# Altium PCB MD040_RevA.PcbDoc (part 4 of 6)
Units mil, origin at the board's own origin, x right, y up, seen from the top; angles counter-clockwise.
Board outline 5000 x 5000 mil, 4 copper layers (Top Layer, Signal Layer 1, Signal Layer 2, Bottom Layer), stack 61.2 mil thick; 336 components, 205 nets, 921 pads, 354 vias.
Unrouted connection lines stored in the file: 124.
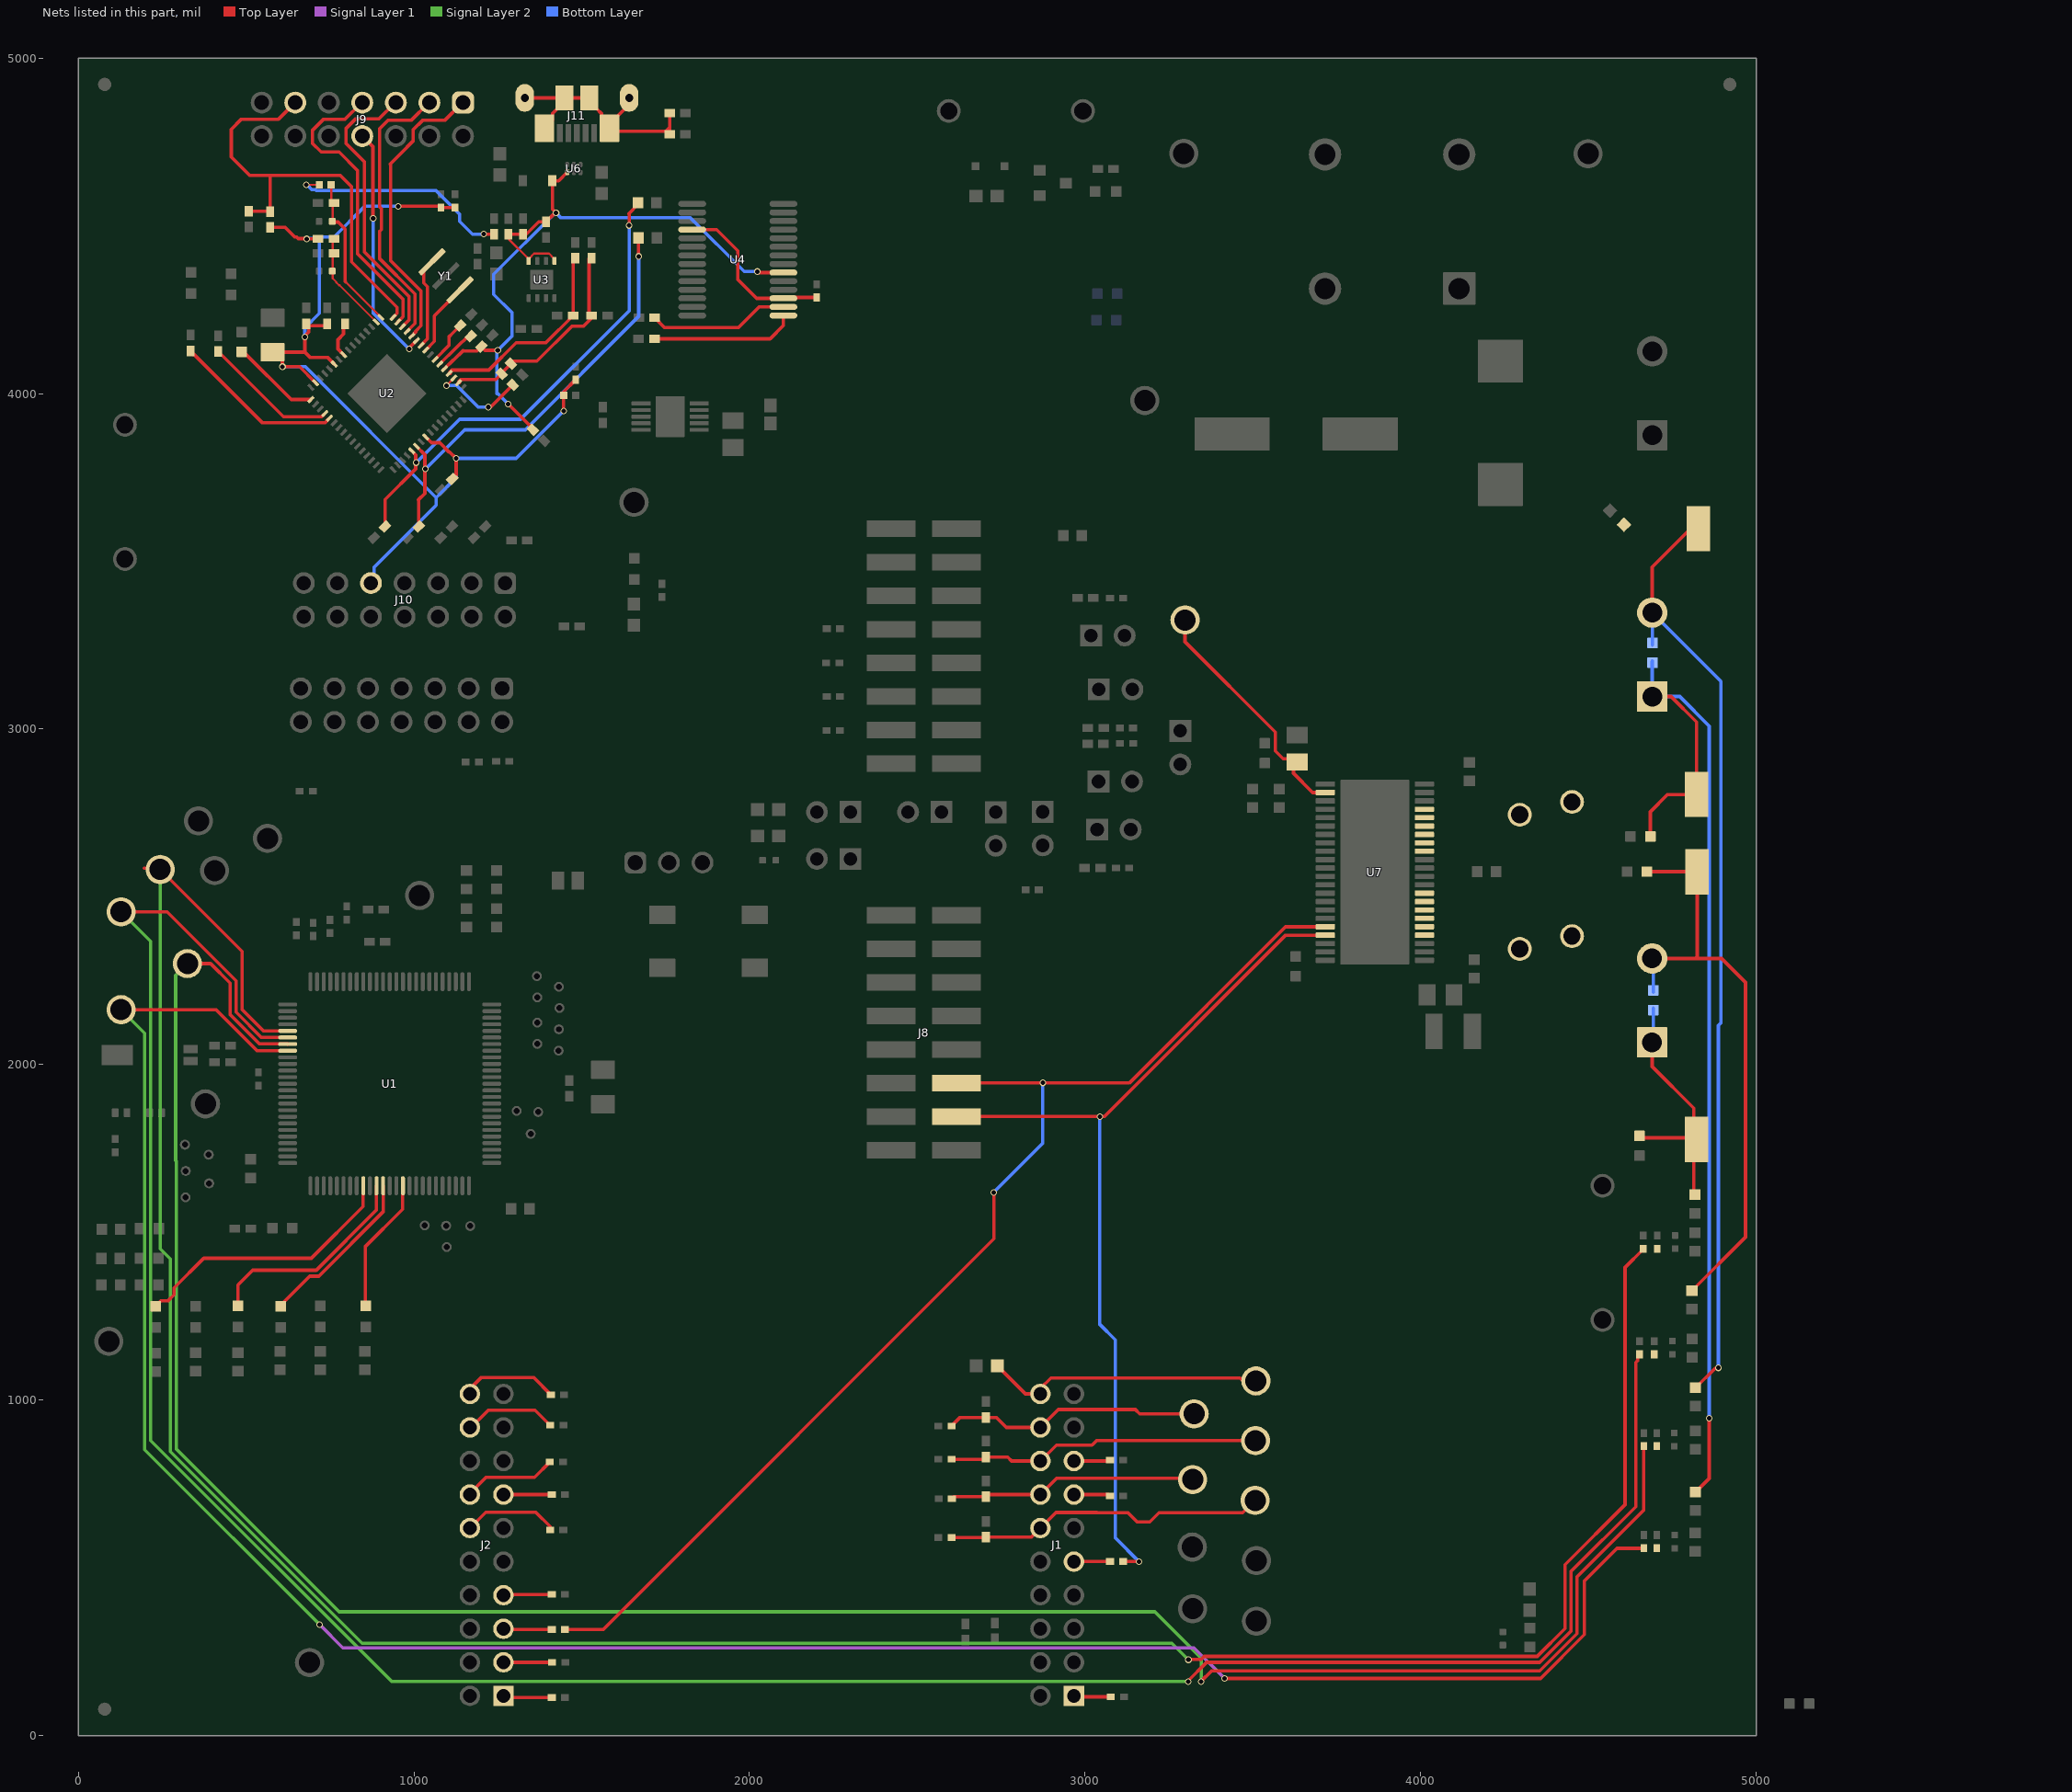
[diagram p5: the nets of this part, all layers, seen from the top]

## Part data (continued)
R77: library part CMP-0026859-2, "RES, 1.0 M, 5%, 0.063 W, AEC-Q200 Grade 0, 0402", Manufacturer=Vishay-Dale, Power_W=63mW, Supplier Part Number 1=541-1.0MJCT-ND, TempCo="200 ppm/C", Tolerance_%=5%, Value2=0.063W, Value_Code=1M00, ValueDisplayed=1.0M, AEC Category=Q200, AEC Grade=0, AEC Qualified=Y, ComponentLink1Description="Datasheet link", ComponentLink1URL=http://www.vishay.com/docs/20035/dcrcwe3.pdf, CompType=Resistor, EIA_Code=E24, MountType=SMT, PackageReference=0402, PartNumber=CRCW04021M00JNED, Res_ohm=1M, RoHS=E, SizeArea_mm2=0.5, SizeX_mm=1, SizeY_mm=0.5, SizeZ_mm=0.6, Supplier 1=Digi-Key, Supplier 2=Newark, Supplier 3=Mouser, Supplier Part Number 2=59M6694, Supplier Part Number 3=71-CRCW0402J-1M-E3, Technology="Thick Film", Value1=5%, VDC_V=50V
R78: library part CMP-0026907-3, "RES, 33 k, 5%, 0.063 W, AEC-Q200 Grade 0, 0402", Manufacturer=Vishay-Dale, Power_W=63mW, Supplier Part Number 1=541-33KJCT-ND, TempCo="200 ppm/C", Tolerance_%=5%, Value2=0.063W, Value_Code=33k0, ValueDisplayed=33k, AEC Category=Q200, AEC Grade=0, AEC Qualified=Y, ComponentLink1Description="Datasheet link", ComponentLink1URL=http://www.vishay.com/docs/20035/dcrcwe3.pdf, CompType=Resistor, EIA_Code=E24, MountType=SMT, PackageReference=0402, PartNumber=CRCW040233K0JNED, Res_ohm=33k, RoHS=E, SizeArea_mm2=0.5, SizeX_mm=1, SizeY_mm=0.5, SizeZ_mm=0.6, Supplier 1=Digi-Key, Supplier 2=Newark, Supplier 3=Mouser, Supplier Part Number 2=59M6727, Supplier Part Number 3=71-CRCW0402J-33K-E3, Technology="Thick Film", Value1=5%, VDC_V=50V
R79 R80 R81 R82: library part CMP-0026695-1, "RES, 3.30 k, 1%, 0.1 W, AEC-Q200 Grade 0, 0402", Manufacturer=Panasonic, Power_W=100mW, Supplier Part Number 1=P3.30KLCT-ND, TempCo="100 ppm/C", Tolerance_%=1%, Value2=0.1W, Value_Code=3k30, ValueDisplayed=3.30k, AEC Category=Q200, AEC Grade=0, AEC Qualified=Y, ComponentLink1Description="Datasheet link", ComponentLink1URL=http://industrial.panasonic.com/cdbs/www-data/pdf/RDA0000/AOA0000C86.pdf, CompType=Resistor, LatestRevisionDate=2017-03-09, MountType=SMT, PackageReference=0402, PartNumber=ERJ-2RKF3301X, Published=2008-06-26, Publisher="Texas Instruments", Res_ohm=3.3k, RoHS=Y, SizeArea_mm2=0.5, SizeX_mm=1, SizeY_mm=0.5, SizeZ_mm=0.6, Supplier 1=Digi-Key, Supplier 2=Newark, Supplier 3=Mouser, Supplier Part Number 2=64R5278, Supplier Part Number 3=667-ERJ-2RKF3301X, Technology="Thick Film", U/M=EA, Value1=1%, VDC_V=50V
R83 R88: library part CMP-0025886-3, "RES, 10 k, 5%, 0.1 W, 0603", Manufacturer="Yageo America", Power_W=100mW, Supplier Part Number 1=311-10KGRCT-ND, TempCo="100 ppm/C", Tolerance_%=5%, Value2=0.1W, Value_Code=10k0, ValueDisplayed=10k, AEC Category=Q200, AEC Qualified=?, ComponentLink1Description="Datasheet link", ComponentLink1URL=http://www.yageo.com/pdf/Pu-RC0603_51_PbFree_L_2.pdf, CompType=Resistor, EIA_Code=E24, LatestRevisionDate=2017-03-09, MountType=SMT, PackageReference=0603, PartNumber=RC0603JR-0710KL, Published=2008-06-26, Publisher="Texas Instruments", Res_ohm=10k, RoHS=Y, SizeArea_mm2=1.28, SizeX_mm=1.6, SizeY_mm=0.8, SizeZ_mm=1, Supplier 1=Digi-Key, Supplier 2=Mouser, Supplier 3=Farnell, Supplier Part Number 2=603-RC0603JR-0710KL, Supplier Part Number 3=9233504, Technology="Thick Film", U/M=EA, Value1=5%, VDC_V=50V
R84 R85 R86 R87: library part CMP-0081856-1, "RES, 0, 0%, 0.2 W, AEC-Q200 Grade 0, 0402", Manufacturer=Vishay-Dale, Power_W=200mW, Supplier Part Number 1=541-0.0YBTR-ND, Tolerance_%=0%, Value2=0.2W, Value_Code=0, AEC Category=Q200, AEC Grade=0, AEC Qualified=Y, ComponentLink1Description="Datasheet link", ComponentLink1URL=http://www.vishay.com/docs/20043/crcwhpe3.pdf, CompType=Resistor, MountType=SMT, PackageReference=0402, PartNumber=CRCW04020000Z0EDHP, Res_ohm=0, RoHS=Y, SizeArea_mm2=0.5, SizeAreaWB_mm2=3, SizeX_mm=1, SizeY_mm=0.5, SizeZ_mm=0.6, Supplier 1=Digi-Key, Supplier 2=Newark, Supplier 3=Mouser, Supplier Part Number 2=96Y9050, Supplier Part Number 3=71-CRCW04020000Z0EDH, Technology="Thick Film", Value1=0%, ValueDisplayed=0, VDC_V=50V
R89 R90 R91 R92: library part CMP-0022628-3, "RES, 86.6 k, 1%, 0.1 W, 0603", Manufacturer=Vishay-Dale, Power_W=100mW, Supplier Part Number 1=541-86.6KHCT-ND, TempCo="100 ppm/C", Tolerance_%=1%, Value2=0.1W, Value_Code=86k6, ValueDisplayed=86.6k, AEC Category=Q200, AEC Qualified=?, ComponentLink1Description="Datasheet link", ComponentLink1URL=http://www.vishay.com/docs/20035/dcrcwe3.pdf, CompType=Resistor, EIA_Code=E96, LatestRevisionDate=2017-03-09, MountType=SMT, PackageReference=0603, PartNumber=CRCW060386K6FKEA, Published=2008-06-26, Publisher="Texas Instruments", Res_ohm=86.6k, RoHS=Y, SizeArea_mm2=1.28, SizeX_mm=1.6, SizeY_mm=0.8, SizeZ_mm=1, Supplier 1=Digi-Key, Supplier 2=Newark, Supplier 3=Mouser, Supplier Part Number 2=52K8751, Supplier Part Number 3=71-CRCW0603-86.6K-E3, Technology="Thick Film", U/M=EA, Value1=1%, VDC_V=75V
R93 R94 R95 R96 R104: library part CMP-0022458-4, "RES, 4.99 k, 1%, 0.1 W, AEC-Q200 Grade 0, 0603", Manufacturer=Vishay-Dale, Power_W=100mW, Supplier Part Number 1=541-4.99KHCT-ND, TempCo="100 ppm/C", Tolerance_%=1%, Value2=0.1W, Value_Code=4k99, ValueDisplayed=4.99k, AEC Category=Q200, AEC Grade=0, AEC Qualified=Y, ComponentLink1Description="Datasheet link", ComponentLink1URL=http://www.vishay.com/docs/20035/dcrcwe3.pdf, CompType=Resistor, EIA_Code=E96, MountType=SMT, PackageReference=0603, PartNumber=CRCW06034K99FKEA, Res_ohm=4.99k, RoHS=E, SizeArea_mm2=1.28, SizeX_mm=1.6, SizeY_mm=0.8, SizeZ_mm=1, Supplier 1=Digi-Key, Supplier 2=Newark, Supplier 3=Mouser, Supplier Part Number 2=52K8500, Supplier Part Number 3=71-CRCW0603-4.99K-E3, Technology="Thick Film", Value1=1%, VDC_V=75V
R98: library part CMP-0025663-3, "RES, 97.6 k, 0.5%, 0.1 W, 0603", Manufacturer="Yageo America", Power_W=100mW, TempCo="50 ppm/C", Tolerance_%=0.5%, Value2=0.1W, Value_Code=97k6, ValueDisplayed=97.6k, AEC Category=Q200, AEC Qualified=?, ComponentLink1Description="Datasheet link", ComponentLink1URL=http://www.yageo.com/pdf/PYu-RT_1-to-0.05_RoHS_L_3.pdf, CompType=Resistor, EIA_Code=E192, LatestRevisionDate=2017-03-09, MountType=SMT, PackageReference=0603, PartNumber=RT0603DRE0797K6L, Published=2008-06-26, Publisher="Texas Instruments", Res_ohm=97.6k, RoHS=Y, SizeArea_mm2=1.28, SizeX_mm=1.6, SizeY_mm=0.8, SizeZ_mm=1, Technology="Thin Film", U/M=EA, Value1=0.5%, VDC_V=75V
R99 R100 R101 R102 R103 R105 R106 R107 R108 R109: library part CMP-0025886-5, "RES, 10 k, 5%, 0.1 W, 0603", Manufacturer=Yageo, Power_W=100mW, Supplier Part Number 1=311-10KGRCT-ND, TempCo="100 ppm/C", Tolerance_%=5%, Value2=0.1W, Value_Code=10k0, ValueDisplayed=10k, AEC Category=Q200, AEC Grade=N/A, AEC Qualified=N, ComponentLink1Description="Datasheet link", ComponentLink1URL=http://www.yageo.com/pdf/Pu-RC0603_51_PbFree_L_2.pdf, CompType=Resistor, EIA_Code=E24, MountType=SMT, PackageReference=0603, PartNumber=RC0603JR-0710KL, Res_ohm=10k, RoHS=Y, SizeArea_mm2=1.28, SizeAreaWB_mm2=4.68, SizeX_mm=1.6, SizeY_mm=0.8, SizeZ_mm=1, Supplier 1=Digi-Key, Supplier 2=Mouser, Supplier 3=Farnell, Supplier Part Number 2=603-RC0603JR-0710KL, Supplier Part Number 3=9233504, Technology="Thick Film", Value1=5%, VDC_V=75V
R110: library part CMP-0023183-5, "RES, 560, 1%, 0.1 W, 0603", Manufacturer=Yageo, Power_W=100mW, Supplier Part Number 1=311-560HRCT-ND, TempCo="100 ppm/C", Tolerance_%=1%, Value2=0.1W, Value_Code=560R, ValueDisplayed=560, AEC Category=Q200, AEC Grade=N/A, AEC Qualified=N, ComponentLink1Description="Datasheet link", ComponentLink1URL=http://www.yageo.com/pdf/Pu-RC0603_51_PbFree_L_2.pdf, CompType=Resistor, MountType=SMT, PackageReference=0603, PartNumber=RC0603FR-07560RL, Res_ohm=560, RoHS=Y, SizeArea_mm2=1.28, SizeAreaWB_mm2=4.68, SizeX_mm=1.6, SizeY_mm=0.8, SizeZ_mm=1, Supplier 1=Digi-Key, Supplier 2=Mouser, Supplier 3=Farnell, Supplier Part Number 2=603-RC0603FR-07560RL, Supplier Part Number 3=9238450, Technology="Thick Film", Value1=1%, VDC_V=75V
R111 R112 R113 R114 R115 R116 R117: "RES, 330, 5%, 0.1 W, AEC-Q200 Grade 0, 0603", Manufacturer=Vishay-Dale, PartNumber=CRCW0603330RJNEA, Power_W=100mW, Supplier Part Number 1=541-330GCT-ND, TempCo="200 ppm/C", Tolerance_%=5%, Value2=0.1W, Value_Code=330R, ValueDisplayed=330, AEC Category=Q200, AEC Grade=0, AEC Qualified=Y, ComponentLink1Description="Datasheet link", ComponentLink1URL=http://www.vishay.com/docs/20035/dcrcwe3.pdf, CompType=Resistor, EIA_Code=E24, MountType=SMT, PackageReference=0603, Res_ohm=330, RoHS=E, SizeArea_mm2=1.28, SizeX_mm=1.6, SizeY_mm=0.8, SizeZ_mm=1, Supplier 1=Digi-Key, Supplier 2=Newark, Supplier 3=Mouser, Supplier Part Number 2=59M6805, Supplier Part Number 3=71-CRCW0603J-330-E3, Technology="Thick Film", Value1=5%, VDC_V=75V
R118: library part CMP-0023129-5, "RES, 470, 1%, 0.1 W, 0603", Manufacturer=Yageo, Power_W=100mW, Supplier Part Number 1=311-470HRCT-ND, TempCo="100 ppm/C", Tolerance_%=1%, Value2=0.1W, Value_Code=470R, ValueDisplayed=470, AEC Category=Q200, AEC Grade=N/A, AEC Qualified=N, ComponentLink1Description="Datasheet link", ComponentLink1URL=http://www.yageo.com/pdf/Pu-RC0603_51_PbFree_L_2.pdf, CompType=Resistor, MountType=SMT, PackageReference=0603, PartNumber=RC0603FR-07470RL, Res_ohm=470, RoHS=Y, SizeArea_mm2=1.28, SizeAreaWB_mm2=4.68, SizeX_mm=1.6, SizeY_mm=0.8, SizeZ_mm=1, Supplier 1=Digi-Key, Supplier 2=Mouser, Supplier 3=Farnell, Supplier Part Number 2=603-RC0603FR-07470RL, Supplier Part Number 3=9238441, Technology="Thick Film", Value1=1%, VDC_V=75V
S1: library part CMP-0097347-1, "Tactile Switch SPST-NO Top Actuated Surface Mount", Coil Resistance_ohm=100mΩ, Contact Current Rating=50mA, Digikey Part Number=732-7022-1-ND, Manufacturer="Wurth Electronics", Mouser Part Number=710-430481025816, Operating Force=160gf, Operating Temperature Range="-40°C to +85°C", AEC Qualified=No, Circuit=SPST-NO, ComponentLink1Description=Datasheet, ComponentLink1URL=https://www.we-online.com/catalog/datasheet/430481025816.pdf, datasheet=https://www.we-online.com/catalog/datasheet/430481025816.pdf, Datasheet Path=datasheets/Switch-430481025816.pdf, Digikey Description="SWITCH TACTILE SPST-NO 0.05A 12V", Electromechanical Life=1000000Cycles, helpURL=https://upverter.com/upn/revision/d8864f3c5ff6f52e/, Lead Free=Yes, MountType="Surface Mount", Mouser Description="Switch Tactile Spst-no 0.05A 12V", PackageReference=SMT_SW_6MM2_6MM2, Part Number=430481025816, PartNumber=430481025816, RoHS=TRUE, SizeZ_mm=2.7mm, Supplier 1=Digikey, Supplier 2=Mouser, Supplier Part Number 1=732-7022-1-ND, Supplier Part Number 2=710-430481025816, VDC_V=12V
SH-J1 SH-J2 SH-J3 SH-J4 SH-J5 SH-J6 SH-J7 SH-J8 SH-J9 SH-J10 SH-J11 SH-J12 SH-J13 SH-J14 SH-J15 SH-J16 SH-J17 SH-J18 SH-J19 SH-J20 SH-J21 SH-J22 SH-J23 SH-J24 SH-J25 SH-J26 SH-J27 SH-J28 SH-J29 SH-J30 SH-J31: library part CMP-0003761-2, "Shunt, 2.54mm, Gold, Black", Manufacturer="Wurth Elektronik", Supplier Part Number 1=732-2678-ND, ClassName=Shunt, ComponentLink1Description="Datasheet Link", ComponentLink1URL=http://katalog.we-online.de/em/datasheet/60900213421.pdf, CompType=Shunt, MountType=N/A, PackageReference="Shunt, 2.54mm, Black", PartNumber=60900213421, RoHS=Y, Supplier 1=Digi-Key, Supplier 2=Newark, Supplier 3=Mouser, Supplier Part Number 2=16T0609, Supplier Part Number 3=710-60900213421
TP1 TP2 TP3 TP4 TP5 TP6 TP7 TP8 TP9 TP10 TP11 TP12 TP18 TP19 TP20 TP21 TP22 TP23 TP24 TP26: library part CMP-0003719-1, "Testpoint", Manufacturer="Texas Instruments", ComponentLink1Description="Datasheet Link", ComponentLink1URL="https://sps06.itg.ti.com/sites/KMS/crossdivteams/altium/docs/ComponentDatasheets/testpin with 750um Padsice and 450um drillhole.pdf", CompType=Pad, Key=TP_H0.45P0.75, LatestRevisionDate=2017-03-09, MountType=TH, PackageReference="Test Point, 0.45mm hole size", PartNumber=TP_H0.45P0.75, Publisher="Texas Instruments"
TP25 TP29: library part CMP-0055148-1, "Test Point, Multipurpose, Black, TH", Color=Black, Manufacturer=Keystone, Supplier Part Number 1=36-5011-ND, CNHeader=FALSE, ComponentLink1Description="Datasheet URL", ComponentLink1URL=http://www.keyelco.com/userAssets/file/M60-2p60.pdf, CompType="Test Point", ContactFinish=Silver, CT=TRUE, Green_EU RoHS=Passed, Green_EU RoHS-2=Incomplete, Green_Lifecycle=Active, Green_REACh=Passed, LatestRevisionDate=26/05/2017, MountType=TH, PackageReference="Black Multipurpose Testpoint", PartNumber=5011, Publisher="Texas Instruments", RoHS=Y, Supplier 1=Digi-Key, Supplier 2=Mouser, Supplier Part Number 2=534-5011
TP27 TP28 TP30 TP36: library part CMP-0055147-1, "Test Point, Multipurpose, Red, TH", Color=Red, Manufacturer=Keystone, Supplier Part Number 1=36-5010-ND, CNHeader=FALSE, ComponentLink1Description="Datasheet URL", ComponentLink1URL=http://www.keyelco.com/userAssets/file/M60-2p60.pdf, CompType="Test Point", ContactFinish=Silver, CT=TRUE, Green_EU RoHS=Passed, Green_EU RoHS-2=Incomplete, Green_Lifecycle=Active, Green_REACh=Passed, LatestRevisionDate=26/05/2017, MountType=TH, PackageReference="Red Multipurpose Testpoint", PartNumber=5010, Publisher="Texas Instruments", RoHS=Y, Supplier 1=Digi-Key, Supplier 2=Mouser, Supplier Part Number 2=534-5010
TP31 TP32 TP34 TP35: library part CMP-0055152-1, "Test Point, Miniature, SMT", Manufacturer=Keystone, Supplier Part Number 1=36-5015TR-ND, CNHeader=FALSE, ComponentLink1Description="Datasheet URL", ComponentLink1URL=http://www.keyelco.com/userAssets/store/files/5015.PDF, CompType="Test Point", CT=TRUE, Green_EU RoHS=Passed, Green_EU RoHS-2=Incomplete, Green_Lifecycle=Active, Green_REACh=Passed, LatestRevisionDate=26/05/2017, MountType=SMT, PackageReference=Testpoint_Keystone_Miniature, PartNumber=5015, Publisher="Texas Instruments", RoHS=Y, Supplier 1=Digi-Key, Supplier 2=Mouser, Supplier Part Number 2=534-5015
U1: library part CMP-0038879-1, "20 MHz Mixed Signal Microcontroller with 256 KB Flash, 18432 B SRAM and 74 GPIOs, -40 to 85 degC, 100-pin QFP (PZ), Green (RoHS & no Sb/Br)", Frequency(MHz)=20, Manufacturer="Texas Instruments", Temp Sensor=Yes, ADC="12-bit SAR", ADC Channels=16, Brown Out Reset=Yes, Code_JEDEC=MS-026, Comparators=Yes, ComponentLink1Description="Manufacturer URL", ComponentLink1URL=http://www.ti.com/, ComponentLink2Description=Datasheet, ComponentLink2URL=http://www.ti.com/general/docs/lit/getliterature.tsp?genericPartNumber=MSP430F5338&fileType=pdf, ComponentLink3Description="Package Specification", ComponentLink3URL=http://www.ti.com/lit/ml/mtqf013a/mtqf013a.pdf, DAC=2, DatasheetVersion=SLAS721B, DMA=3, Eco-Plan="Green (RoHS & no Sb/Br)", Flash(KB)=256, GPIO=74, Mounting Technology="Surface Mount", Multiplier=32x32, PackageDescription="100-Pin Plastic Flat Pack, Body 14 x 14 mm, Pitch 0.5 mm", PackageReference=PZT0100A, PackageVersion=4040149/B, PartNumber=MSP430F5338IPZ, Real-Time Clock=Yes, SRAM(B)=18432, SubFamily="5 Series", SVS=Yes, Timers - 16-bit=4, USCI_A (UART/LIN/IrDA/SPI)=2, USCI_B (I2C & SPI)=2, Watchdog=Yes
U2: "16-Bit Ultra-Low-Power Microcontroller, 128KB Flash, 8KB RAM, USB, 12Bit ADC, 2 USCIs, 32Bit HW MPY, RGC0064B (VQFN-64)", Alternate Manufacturer="Texas Instruments", Alternate PartNumber=MSP430F5528IRGCR, Frequency(MHz)=25, Operating Temperature Range="-40 to 85 C", PartNumber=MSP430F5528IRGCT, Rating=Catalog, Temp Sensor=Yes, ADC="12-bit SAR", ADC Channels=16, AEC Category=Q200, AEC Qualified=N, Brown Out Reset=Yes, Comparators=Yes, ComponentLink1Description="Datasheet Link", ComponentLink1URL=http://www.ti.com/lit/ds/symlink/msp430f5528.pdf, ComponentLink2Description="Product Folder", ComponentLink2URL=http://www.ti.com/product/msp430f5528, ComponentLink3Description="Online Datasheet", ComponentLink3URL=http://www.ti.com/product/msp430f5528/datasheet, CompType=IC, DMA=3, Flash(KB)=128, GPIO=47, Green_EU RoHS=Passed, Green_EU RoHS-2=Passed, Green_Lifecycle=Active, Green_REACh=Passed, Manufacturer="Texas Instruments", MountType=SMT, Multiplier=32x32, PackageDescription=VQFN-64, PackageReference=RGC0064B, Real-Time Clock=Yes, RoHS=Y, SizeArea_mm2=81.0, SizeAreaWB_mm2=121.0, SizeX_mm=9.0, SizeY_mm=9.0, SizeZ_mm=1.0, SRAM(B)=8192, SVS=Yes, Timers - 16-bit=4, USB=1, USCI_A (UART/LIN/IrDA/SPI)=2, USCI_B (I2C & SPI)=2, Watchdog=Yes
U3: library part CMP-0036328-3, "500mA, Adjustable, Low Quiescent Current, Low-Noise, High-PSRR, Single-Output LDO Regulator, DRB0008A (VSON-8)", Manufacturer="Texas Instruments", Operating Temperature Range="-40 to 125 C", Rating=Catalog, Accuracy(%)=2, AEC Category=Q200, AEC Qualified=N, ComponentLink1Description="Datasheet Link", ComponentLink1URL=http://www.ti.com/lit/ds/symlink/tps735.pdf, ComponentLink2Description="Product Folder", ComponentLink2URL=http://www.ti.com/product/tps735, ComponentLink3Description="Online Datasheet", ComponentLink3URL=http://www.ti.com/product/tps735/datasheet, CompType=IC, Fixed Output Options(V)=3.3, Green_EU RoHS=Passed, Green_EU RoHS-2=Passed, Green_Lifecycle=Active, Green_REACh=Passed, Iout(Max)(A)=0.5, Iq(Typ)(mA)=0.04, MountType=SMT, PackageDescription=VSON-8, PackageReference=DRB0008A, PartNumber=TPS73533DRBR, RoHS=Y, SizeArea_mm2=9.0, SizeAreaWB_mm2=16.0, SizeX_mm=3.0, SizeY_mm=3.0, SizeZ_mm=1.0, Vdo(Typ)(mV)=280, Vin(Max)(V)=6.5, Vin(Min)(V)=2.7, Vout Adj(Max)(V)=3.3, Vout Adj(Min)(V)=3.3
U4: library part CMP-0004774-1, "USB to Serial UART, SSOP28", Manufacturer=FTDI, Supplier Part Number 1=768-1007-1-ND, ComponentLink1Description="Datasheet URL", ComponentLink1URL=http://www.ftdichip.com/Support/Documents/DataSheets/ICs/DS_FT232R.pdf, LatestRevisionDate=09/03/2017, MountType=SMT, PackageReference=SSOP28, PartNumber=FT232RL, Publisher="Texas Instruments", RoHS=Y, Supplier 1=Digi-Key, Supplier 2=Newark, Supplier 3=Mouser, Supplier Part Number 2=91K9918, Supplier Part Number 3=895-FT232RL
U5: library part CMP-0090815-1, "LDO, Fixed Output, Dual, 3.3V, 10/12/15V, 50mA, Precision Enable, Power-Good, HVSSOP10", Dropout Voltage=200/800mV, Manufacturer="Texas Instruments", Max Supply Voltage=85V, Min Supply Voltage=4V, Nominal Supply Current=100uA, Operating Temperature Range="-40°C to +125°C", Output Voltage=3.3/10/12/15V, Accuracy Percentage=1%, AEC Qualified=No, Datasheet Path=datasheets/IC-TPS7A4333DGQ.pdf, helpURL=https://upverter.com/upn/revision/84571c77b8b37202/, Number Of Outputs=2, Output Type=Fixed,Multi, PackageReference=HVSSOP10, Part Number=TPS7A4333DGQ, PartNumber=TPS7A4333DGQ, RoHS=UNKNOWN, SizeZ_mm=1.1mm, Standoff Height=0.05mm, TJmax_C=+125°C
U6: library part CMP-0043099-3, "Low-Capacitance 2-Channel +/-15kV ESD Protection Array for High-Speed Data Interfaces, DRY0006A (USON-6)", Breakdown Voltage(Min)(V)=11, IO Capacitance(Typ)(pF)=1.5, IO Leakage Current(nA)=1, Manufacturer="Texas Instruments", Operating Temperature Range="-40 to 85 C", Rating=Catalog, AEC Category=Q200, AEC Qualified=N, ComponentLink1Description="Datasheet Link", ComponentLink1URL=http://www.ti.com/lit/ds/symlink/tpd2e001.pdf, ComponentLink2Description="Product Folder", ComponentLink2URL=http://www.ti.com/product/tpd2e001, ComponentLink3Description="Online Datasheet", ComponentLink3URL=http://www.ti.com/product/tpd2e001/datasheet, CompType=IC, Eco-Plan="Green (RoHS & no Sb/Br)", IEC 61000-4-2 Air-Gap(+/- kV)=15, IEC 61000-4-2 Contact(+/- kV)=8, MountType=SMT, PackageDescription=USON-6, PackageReference=DRY0006A, PartNumber=TPD2E001DRYR, RoHS=Y, SizeArea_mm2=1.45, SizeAreaWB_mm2=4.9, SizeX_mm=1.0, SizeY_mm=1.45, SizeZ_mm=0.6, USB High Speed=TRUE
U7: library part CMP-0094066-1, "Stepper Motor Driver with Automatic Microstepping, Silent step Decay Mode and Auto-torque", Manufacturer="Texas Instruments", Max Supply Voltage=60V, Min Supply Voltage=4.5V, Nominal Supply Current=3-7mA, Operating Temperature Range="-40°C to +150°C", Switching Frequency=500kHz, AEC Qualified=No, Datasheet Path=datasheets/IC-DRV8462DDWR.pdf, helpURL=https://upverter.com/upn/revision/188eb21097f53541/, Motor Type=Stepper, Number Of Outputs=1, PackageReference=HTSSOP44, Part Number=DRV8462DDWR, PartNumber=DRV8462DDWR, RoHS=UNKNOWN, SizeZ_mm=1.2mm, Standoff Height=0.05mm, TaMax_C=+125°C, TaMin_C=-40°C, TJmax_C=+150°C
Y1: library part CMP-0085483-1, "Oscillator, 4 MHz, 700 ppm, 39 pF, SMD", Frequency_Fixed=4MHz, Frequency Tolerance="700 ppm", Load Capacitance="39 pF", Manufacturer=MuRata, AEC Category=Q200, AEC Grade=N/A, AEC Qualified=N, ComponentLink1Description="Datasheet Link", ComponentLink1URL=https://www.murata.com/en-us/products/productdata/8802049818654/SPEC-CSTNR6M00GH5L000R0.pdf?1528293605000, CompType=Oscillator, MountType=SMT, PackageReference=4.5x2mm, PartNumber=CSTNR4M00GH5L000R0, RoHS=Y, SizeArea_mm2=9, SizeAreaWB_mm2=16.5, SizeX_mm=4.5, SizeY_mm=2, SizeZ_mm=1.2, TaMax_C=85°C, TaMin_C=-20°C
Y2: library part CMP-0004566-4, "Crystal, 32.768 kHz, 12.5pF, SMD", Frequency Tolerance="20 ppm", Frequency_Fixed=32.768kHz, Load Capacitance="12.5 pF", Manufacturer="Micro Crystal AG", Supplier Part Number 1=94M8466, AEC Category=Q200, AEC Grade=N/A, AEC Qualified=N, ComponentLink1Description="Datasheet Link", ComponentLink1URL=http://www.microcrystal.com/images/_Product-Documentation/03_TF_metal_Packages/02_Crystal_Documentation/MS3V-T1R_Product-Doc.pdf, CompType=Crystal, MountType=SMT, PackageReference="1.4x1.4x5.0mm SMD", PartNumber="MS3V-T1R 32.768KHZ +/-20PPM 12.5PF", REACh=Y, RoHS=Y, Supplier 1=Newark, Supplier 2=Farnell, Supplier Part Number 2=1539368, TaMax_C=85°C, TaMin_C=-40°C
ZZ1: library part CMP-0003616-3, ClassName=AssemblyNote, CompType=AssemblyNote, Key=AssemblyNoteLabel, LatestRevisionDate=2017-03-09, Publisher="Texas Instruments"
ZZ2: library part CMP-0077236-1, ClassName=AssemblyNote, CompType=AssemblyNote, Key=AssemblyNote, LatestRevisionDate=2017-08-10, Publisher="Texas Instruments"
ZZ3: library part CMP-0077237-1, ClassName=AssemblyNote, CompType=AssemblyNote, Key=AssemblyNote, LatestRevisionDate=2017-08-10, Publisher="Texas Instruments"
ZZ4: library part CMP-0077238-1, ClassName=AssemblyNote, CompType=AssemblyNote, Key=AssemblyNote, LatestRevisionDate=2017-08-10, Publisher="Texas Instruments"

## Via types
v1: diameter 19.68, hole 13.78, Top Layer to Bottom Layer, tented both sides, 232 vias
v2: diameter 19.68, hole 7.87, Top Layer to Bottom Layer, 87 vias
v3: diameter 19.68, hole 13.78, Top Layer to Bottom Layer, tented bottom, 31 vias
v4: diameter 141.73, hole 141.73, Top Layer to Bottom Layer, tented both sides, 4 vias

## Nets (pads, with @x,y where several pads share a name; then routed paths per layer and width w, separated by ;. In a path a pad name is that pad's centre, name@x,y a point inside that pad or via, vN(x,y) a via of type N, cw(c..) or ccw(c..) an arc to the next point about the centre after c; other vN are vias at no path point)
3.3V_COM: C41.1 U4.4 U4.17 | length 506.8
  Top Layer w10: U4.4@1829.44,4488.57 1902.43,4488.57 1965.27,4425.73 1965.27,4339.73 2021.16,4283.84 U4.17@2101.09,4283.84 2103.56,4286.31 C41.1@2200,4286.31
A12: A1.1 R5.2 U1.5 | length 8119.6
  Top Layer w10: 196.26,2585.17 A1.1@207.11,2585.17 ; A1.1@244.12,2581.6 488.25,2337.48 488.25,2163.78 551.66,2100.38 U1.5@623.91,2100.38 ; v1(3308,226) 3309.12,227.12 3345.84,227.12 3354.72,236 4347.3,236 4430.25,318.95 4430.25,509.25 4609,688 4609,1395.35 4663,1449.35 R5.2@4663,1451.31
  Signal Layer 2 w10: A1.1@244.12,2581.6 244.12,1450.88 274.26,1420.74 274.26,846.46 845.66,275.06 3258.94,275.06 v1(3308,226)
A13: A2.1 R8.2 U1.6 | length 7820.8
  Top Layer w10: A2.1@115.56,2429.33 A2.1@116.56,2428.33 ; A2.1@127.56,2455.33 264.92,2455.33 470.38,2249.88 470.38,2156.38 546.06,2080.69 U1.6@623.91,2080.69 ; v1@3307,163 3362.13,218.13 4354.71,218.13 4448.13,311.55 4448.13,489.42 4641,682.29 4641,1112.35 4647.16,1118.5 4647.16,1131.47 R8.2@4652,1136.31
  Signal Layer 2 w10: A2.1@127.56,2455.33 215.65,2367.24 215.65,879.79 933.61,161.83 3305.83,161.83 v1@3307,163
  other v1: 3307,161
A14: A3.1 R13.2 U1.7 | length 7115.8
  Top Layer w10: A3.1@325.39,2301 393.98,2301 452.5,2242.48 452.5,2148.97 539.56,2061.91 623,2061.91 U1.7@623.91,2061.01 ; v1@3346,162 3377,193 4354.86,193 4466,304.14 4466,473.42 4665,672.42 R13.2@4665,862.49
  Signal Layer 2 w10: A3.1@325.39,2301 290.13,2265.74 290.13,1713.75 292.13,1711.75 292.13,853.87 777,369 3208,369 3346,231 v1@3346,162
  other v1: 3346,161
A15: A4.1 R16.2 U1.8 | length 6872.2
  Top Layer w10: A4.1@141.53,2163.78 410.22,2163.78 532.68,2041.32 U1.8@623.91,2041.32 ; v1(3416,170.28) 4357.42,170.28 4488,300.87 4488,461.1 4585.21,558.31 R16.2@4665,558.31
  Signal Layer 1 w10: v1(719,331) 788.17,261.83 3324.45,261.83 v1(3416,170.28)
  Signal Layer 2 w10: A4.1@141.53,2163.78 141.53,2149.82 197.78,2093.56 197.78,852.22 v1(719,331)
ACCEL/DECEL: D10.2 U1.37 | length 501
  Top Layer w10: D10.2@601.14,1280.86 689.54,1369.26 716.59,1369.26 908.35,1561.02 U1.37@908.35,1638.76
AOUT1/OUT1: C52.2 C60.1 J14.1 J22.2 R89.2 TP31.1 U7.4 U7.5 U7.6 | length 779.8
  Top Layer w10: C52.2@4652,1781.62 TP31.1@4814.04,1781.62 ; J14.1@4689.82,2066.28 4689.82,1993.97 4814.04,1869.75 TP31.1@4814.04,1781.62 ; R89.2@4814.04,1613.27 TP31.1@4814.04,1781.62 ; TP31.1@4821.94,1777 4817.31,1781.62 TP31.1@4814.04,1781.62
  Bottom Layer w10: J14.1@4689.82,2066.28 4693.24,2069.7 C60.1@4693.24,2168.38
AOUT2/OUT2: C60.2 C61.2 J14.2 J24.2 R90.2 TP32.1 U7.7 U7.8 U7.9 | length 1810.9
  Top Layer w10: C61.2@4668.62,2575.07 4823.53,2575.07 TP32.1@4824,2574.6 4824,2321.28 4819,2316.28 ; J14.2@4689.82,2316.28 4819,2316.28 ; R90.2@4808.22,1326.05 4968,1485.84 4968,2245 4896.72,2316.28 4819,2316.28
  Bottom Layer w10: J14.2@4689.82,2316.28 4693.24,2312.86 C60.2@4693.24,2215.62
BOUT1/OUT3: C64.2 C65.1 J13.2 J22.1 R91.2 TP34.1 U7.17 U7.18 U7.19 | length 2860.3
  Top Layer w10: J13.2@4690,3347 4690,3483 TP34.1@4828,3621 ; R91.2@4818.48,1036.69 4819.46,1036.69 4876.92,1094.15 4885.33,1094.15 v1(4887.18,1096)
  Bottom Layer w10: C65.1@4691,3250.62 4690.5,3251.12 4690.5,3346.5 J13.2@4690,3347 4894.93,3142.07 4894.93,2124.22 4887.18,2116.48 v1(4887.18,1096)
BOUT2/OUT4: C65.2 C66.2 J13.1 J24.1 R92.2 TP35.1 U7.14 U7.15 U7.16 | length 3225.1
  Top Layer w10: C66.2@4684.53,2679.86 4684.53,2753.48 4736.05,2805 TP35.1@4822,2805 4822,3021 4746,3097 J13.1@4690,3097 ; R92.2@4819.04,726.56 4820.03,726.56 4860,766.53 v1(4860,946)
  Bottom Layer w10: C65.2@4691,3203.38 4690,3202.38 J13.1@4690,3097 4772,3097 4860,3009 v1(4860,946)
C2K_3V3: J1.1 R1.2 | length 110.6
  Top Layer w10: J1.1@2966.94,118.45 2969.7,115.69 R1.2@3076.39,115.69
C2K_AOUT1: R7.2
C2K_AOUT2: R10.2
C2K_BOUT1: R12.2
C2K_BOUT2: R15.2
C2K_DECAY0/SDI/DECAY/EN1: J2.12 R26.2 | length 286.3
  Top Layer w10: J2.12@1166.94,618.45 1214.5,666 1363.14,666 1406,623.14 R26.2@1406,613.3
C2K_DECAY1/SDO/RSVD/EN2: J2.14 R25.2 | length 280.8
  Top Layer w10: J2.14@1166.94,718.45 1166.94,721.94 1215,770 1359.31,770 R25.2@1405.31,816
C2K_DIR/IN2/PH2: J2.5 R32.2 | length 144.9
  Top Layer w10: J2.5@1266.94,318.45 1268.91,316.48 R32.2@1411.04,316.48
C2K_ENABLE/IN1/PH1: J1.9 R33.2 | length 107.8
  Top Layer w10: J1.9@2966.94,518.45 2991,518.45 2991.79,519.24 R33.2@3074.43,519.24
C2K_IPROPI1/IPROPI2: C4.1 J1.14 R18.2 TP42.1 | length 744.6
  Top Layer w10: R18.2@2602.93,706.24 2608.84,712.15 C4.1@2704.47,712.15 2710.77,718.45 J1.14@2866.94,718.45 2915.5,767 3316.69,767 TP42.1@3320.69,763
C2K_IPROPI2/IPROPI3: C5.1 J1.16 R17.2 TP43.1 | length 938.6
  Top Layer w10: R17.2@2601.98,823.65 2697.87,823.65 C5.1@2704.47,830.26 2769.54,830.26 2781.35,818.45 J1.16@2866.94,818.45 2914.5,866 3020.69,866 3033.68,879 TP43.1@3507.9,879
C2K_M0/nSCS/VREF1/EN4: J2.18 R23.2 | length 279.4
  Top Layer w10: J2.18@1166.94,918.45 1170.26,918.45 1221.81,970 1361.31,970 R23.2@1406.31,925
C2K_M1/SCLK/IN4/PH4: J1.13 R27.2 | length 109.3
  Top Layer w10: J1.13@2966.94,718.45 3070.09,718.45 R27.2@3074.43,714.12
C2K_MODE2/IPROPI4: C6.1 J1.18 R14.2 TP44.1 | length 773.6
  Top Layer w10: R14.2@2601.98,922.78 2627.57,948.37 C6.1@2704.47,948.37 2735.63,948.37 2765.55,918.45 J1.18@2866.94,918.45 2920.5,972 3150,972 3163,959 TP44.1@3325,959
C2K_MODE/MODE1: J2.13 R11.2 | length 144.1
  Top Layer w10: J2.13@1266.94,718.45 R11.2@1411.04,718.45
C2K_nFAULT: J1.15 R6.2 | length 108.7
  Top Layer w10: J1.15@2966.94,818.45 3071.47,818.45 R6.2@3074.43,821.4
C2K_nHOME/OCPM: J2.1 R9.2 | length 146.1
  Top Layer w10: J2.1@1266.94,118.45 1271.67,113.72 R9.2@1411.04,113.72
C2K_nSLEEP: J2.7 R34.2 | length 145.1
  Top Layer w10: J2.7@1266.94,418.45 1269.31,420.81 R34.2@1411.04,420.81
C2K_RSVD/IPROPI1: C3.1 J1.12 R21.2 TP41.1 | length 974.2
  Top Layer w10: R21.2@2601.98,590.26 2703.09,590.26 C3.1@2704.47,591.63 2840.13,591.63 J1.12@2866.94,618.45 2913.5,665 3035,665 3036.01,663.99 3127.84,663.99 3155.21,636.63 3192.79,636.63 3220.16,663.99 3469.79,663.99 TP41.1@3506.81,701
C2K_STEP/IN3/PH3: J2.20 R30.2 | length 291.9
  Top Layer w10: J2.20@1166.94,1018.45 1166.94,1033.43 1201.14,1067.62 1356.69,1067.62 R30.2@1408.31,1016
C2K_TOFF/RSVD/EN3: J2.3 R24.2 | length 145.1
  Top Layer w10: J2.3@1266.94,218.45 R24.2@1412,218.45
C2K_VREF: J1.20 R19.1 TP45.1 | length 851.9
  Top Layer w10: R19.1@2738.65,1102 2822.2,1018.45 J1.20@2866.94,1018.45 2866.94,1034.94 2898,1066 3461.49,1066 TP45.1@3507.5,1019.99
DIR/IN2: J8.12 R32.1 U7.40 | length 3590.6
  Top Layer w10: R32.1@1450.41,316.48 1564.48,316.48 2728.81,1480.81 v1@2728.81,1620 ; J8.12@2617.03,1945 3131.72,1945 3597.4,2410.67 U7.40@3727.93,2410.67
  Bottom Layer w10: v1(2728,1619) 2874,1765 v1(2874,1945.5)
DM: R73.2 U4.16 | length 420.9
  Top Layer w10: R73.2@1717.62,4226.15 1746.77,4197 1967.5,4197 2028.75,4258.25 U4.16@2101.09,4258.25
DP: R71.2 U4.15 | length 430.4
  Top Layer w10: R71.2@1717,4163.18 2061.53,4163.18 2101.09,4202.74 U4.15@2101.09,4232.66
DRV_ENABLE: D9.2 U1.36 | length 641.1
  Top Layer w10: D9.2@475.6,1280.24 475.6,1343 519.73,1387.13 709.19,1387.13 887.76,1565.7 887.76,1638.76 U1.36@888.67,1638.76
DVDD: C49.1 TP28.1 U7.24 | length 739.4
  Top Layer w10: TP28.1@3298,3325 3297.87,3324.87 3297.87,3260.13 3567,2991 3567,2935 3590.53,2911.47 3621,2911.47 3621,2868 3678.33,2810.67 U7.24@3727.93,2810.67
ENABLE/IN1: J8.14 R33.1 U7.41 | length 2756.1
  Top Layer w10: J8.14@2617.03,1845 v1(3044,1845) 3057,1845 3597.67,2385.67 U7.41@3727.93,2385.67 ; R33.1@3113.8,519.24 v1@3160,519.24
  Bottom Layer w10: v1(3044,1845) 3044,1225.21 3090,1179.21 3090,589.5 v1(3161,518.5)
EVM_STATUS: D6.2 U1.34 | length 815.6
  Top Layer w10: D6.2@230.07,1279.8 245.79,1295.52 267.04,1295.52 285.06,1313.53 285.06,1333.97 373.96,1422.88 694.38,1422.88 848.39,1576.89 848.39,1637.86 U1.34@849.3,1638.76
EZFET_AVBUS: C24.1 R56.1 R61.2 U2.1 | length 474.7
  Top Layer w6: R56.1@753.72,4622 753.72,4575.91 R61.2@761.62,4568 ; C24.1@756.68,4513 757.97,4514.28 R61.2@757.97,4564.34 ; 796.12,4333 U2.1@901.83,4227.3 ; R61.2@757.97,4564.34 R61.2@761.62,4568 ; R61.2@757.97,4564.34 R61.2@761.62,4568
  Top Layer w10: C24.1@756.68,4513 758.46,4511.23 774.42,4511.23 795.32,4490.32 795.32,4333.8 796.12,4333
EZFET_AVCC2ADC: C22.1 R55.1 R60.2 U2.2 | length 308.5
  Top Layer w6: R60.2@761.62,4418 R60.2@760.12,4419.5 ; R55.1@761.62,4461 758.08,4457.46 758.08,4421.54 R60.2@760.12,4419.5 ; U2.2@887.91,4213.38 778.52,4322.76 777.42,4322.76 769.29,4330.89 769.29,4331.99 758.08,4343.21 758.08,4363.61 C22.1@756.68,4365 758.08,4366.39 758.08,4417.46 R60.2@760.12,4419.5
EZFET_D_N: C42.1 R72.2 U2.52 | length 617
  Top Layer w10: U2.52@1105.05,4060.07 1108,4060.07 1108,4065.31 1112.58,4069.89 1223.18,4069.89 1304.78,4151.49 1393.35,4151.49 C42.1@1474.52,4232.66 1474.52,4396.53 R72.2@1480.94,4402.95
EZFET_D_P: C43.1 R75.2 R76.1 R77.2 U2.50 | length 675.1
  Top Layer w10: U2.50@1132.89,4032.23 1135.45,4032.23 1135.45,4037.74 1139.77,4042.05 1244.21,4042.05 R76.1@1261.18,4059.03 1261.18,4060.59 R77.2@1289.65,4089.06 1289.65,4096.64 1366.78,4096.64 1471.24,4201.1 1505.69,4201.1 1530.07,4225.47 C43.1@1530.07,4232.66 1521.9,4240.83 1521.9,4402.25 1530.07,4402.25 R75.2@1529.37,4402.95
EZFET_LED0: R58.2 U2.20 | length 397.7
  Top Layer w10: R58.2@417.14,4125.08 417.14,4121.15 423.95,4114.34 427.88,4114.34 611.69,3930.53 724.58,3930.53 U2.20@729.79,3935.74
EZFET_LED1: R59.2 U2.21 | length 504.3
  Top Layer w10: R59.2@334.39,4127.31 334.39,4123.37 341.2,4116.56 345.14,4116.56 549.03,3912.66 734.55,3912.66 U2.21@743.71,3921.82
EZFET_PUR: R76.2 U2.51 | length 282.9
  Top Layer w6: v1(1097.09,4023.93) 1118.97,4045.81 U2.51@1118.97,4046.34
  Top Layer w10: v1(1222,3959.64) 1228.6,3959.64 1270,4001.03 R76.2@1294.59,4025.62
  Bottom Layer w10: v1(1097.09,4023.93) 1127.55,4023.93 1191.85,3959.64 v1(1222,3959.64)
EZFET_RST: C23.1 J9.11 R57.1 U2.64 | length 1326
  Top Layer w10: C23.1@508,4543.4 571.22,4543.4 R57.1@572,4542.62 572,4646.64 576,4650.64 ; J9.11@646.43,4867.4 596.82,4817.8 486.16,4817.8 455.84,4787.48 455.84,4704.8 510,4650.64 576,4650.64 ; U2.64@938.02,4227.1 938.02,4227.3 949.91,4239.18 949.91,4257.23 814.52,4392.62 814.52,4616.48 780.36,4650.64 576,4650.64
EZFET_TCK: J9.7 U2.63 | length 899.5
  Top Layer w10: J9.7@842.76,4865.24 795.32,4817.8 731.18,4817.8 697.4,4784.03 697.4,4746.46 723.97,4719.89 777.38,4719.89 832.39,4664.88 832.39,4416.39 967.78,4281 967.78,4229.22 U2.63@951.94,4213.38
EZFET_TDI: J9.3 U2.61 | length 839
  Top Layer w10: U2.61@979.78,4185.54 1003.53,4209.29 1003.53,4296.6 897.4,4402.72 897.4,4482.82 903.27,4488.68 903.27,4550.87 897.4,4556.73 897.4,4788.85 922.81,4814.26 991.77,4814.26 J9.3@1042.76,4865.24
EZFET_TDO: J9.1 U2.60 | length 870.4
  Top Layer w10: U2.60@993.7,4171.62 1005.58,4183.51 1005.58,4186.06 1021.4,4201.89 1021.4,4305.6 930.28,4396.72 930.28,4683.05 929.32,4684.01 959.16,4713.84 997.4,4752.09 997.4,4786.01 1025.65,4814.26 1091.77,4814.26 J9.1@1142.76,4865.24
EZFET_TEST: J9.8 U2.59 | length 726
  Top Layer w10: J9.8@846.43,4767.4 878,4735.83 v1@878,4522 ; v1(985.79,4132.8) 985.79,4135.87 1007.52,4157.6 U2.59@1007.62,4157.7
  Bottom Layer w10: v1(878.61,4522) 878.61,4239.98 v1(985.79,4132.8)
EZFET_TMS: J9.5 U2.62 | length 852.8
  Top Layer w10: J9.5@942.76,4865.24 896.77,4819.26 827.42,4819.26 797.4,4789.23 797.4,4746.46 852.92,4690.94 852.92,4421.92 985.65,4289.19 985.65,4219.25 U2.62@965.86,4199.46
EZFET_UARTRXD: R66.1 R70.2 U2.38 | length 1321.8
  Top Layer w10: U2.38@1007.62,3843.12 1032.67,3818.06 1032.67,3702.29 1013.69,3683.31 1014.4,3682.6 R66.1@1014.4,3603.85 ; v1@1669.51,4403.25 R70.2@1669.51,4463.9
  Bottom Layer w10: v1(1034.17,3774.94) 1151.23,3892 1332,3892 1670,4230 v1(1670,4409)
EZFET_UARTTXD: R67.1 R69.1 U2.37 | length 1424.8
  Top Layer w10: R67.1@914.12,3603.8 914.12,3683.88 ; U2.37@993.7,3829.2 1005.58,3817.31 1005.58,3775.43 914.08,3683.92 ; v1(1641.53,4501) 1641.53,4535.07 1640.61,4535.98 1668.24,4563.61 R69.1@1668.24,4569 ; 914.08,3683.92 914.12,3683.88
  Bottom Layer w10: v1(1006.61,3794) 1006.68,3794 1135.89,3923.21 1318.06,3923.21 1641.53,4246.68 v1(1641.53,4501)
EZFET_USB_Shield: C47.1 J11.6 J11.7 J11.8 J11.9 J11.10 J11.11 R78.2 | length 818.9
  Top Layer w10: J11.10@1330.35,4881.19 J11.9@1448.95,4881.19 ; J11.11@1388.91,4790.63 1412.95,4814.67 1412.95,4834.85 1448.95,4870.85 J11.9@1448.95,4881.19 ; J11.8@1522.77,4881.19 J11.8@1522.77,4850.67 ; J11.7@1641.37,4881.19 1641.37,4861.5 1582.81,4802.94 J11.6@1582.81,4790.63 ; C47.1@1762.38,4773.03 1762.38,4793.53 ; R78.2@1762.38,4836 1762.38,4793.53 ; J11.9@1448.95,4881.19 1500.7,4881.19 1522.77,4859.12 J11.8@1522.77,4850.67 ; J11.8@1522.77,4850.67 1524.66,4848.78 1544.84,4848.78 1558.77,4834.85 1558.77,4814.67 J11.6@1582.81,4790.63 ; J11.6@1582.81,4790.63 1592.13,4781.31 1750.16,4781.31 1762.38,4793.53
EZFET_V18: C28.1 U2.55 | length 131.5
  Top Layer w10: U2.55@1063.29,4102.02 1104.3,4142.94 1104.3,4168.64 1116,4180.34 C28.1@1138.14,4202.49
EZFET_VBUS: C20.1 C21.1 C35.1 C36.1 C37.1 C48.1 D3.1 R56.2 U2.53 U3.5 U3.8 U4.20 U6.1 | length 2946.8
  Top Layer w6: v1(679.39,4622) R56.2@718.28,4622 ; C36.1@1281.11,4474.55 1283.68,4471.98 1283.68,4459.22 U3.8@1342.31,4400.6 ; U3.8@1342.31,4394.89 U3.8@1342.31,4400.6 ; U3.5@1419.08,4394.89 1419.08,4400.6 1410.47,4409.21 1410.47,4410.06 1402.95,4417.57 1358.44,4417.57 1350.92,4410.06 1350.92,4409.21 U3.8@1342.31,4400.6
  Top Layer w10: U2.53@1091.13,4074.18 1146.43,4127.66 ; 1147.06,4127.03 1187.68,4127.03 C20.1@1200.7,4140.04 1211.7,4129.04 v1(1250,4129.04) ; v1(1208.13,4475.17) C35.1@1235.69,4475.17 ; v1(1280.96,3969) 1354.59,3895.37 C21.1@1354.59,3892.41 ; C36.1@1281.11,4474.55 1325.14,4474.55 1334.63,4474.53 1372.03,4511.93 C48.1@1393.91,4511.93 1420.57,4538.6 v1(1423.83,4538.6) 1412.73,4549.7 D3.1@1412.73,4634 1431.28,4634 U6.1@1457.03,4659.75 ; v1@2023.71,4360.61 U4.20@2101.09,4360.61
  Bottom Layer w10: v1(679.39,4622) 682.01,4622 696.69,4607.32 706.91,4607.32 709.23,4605 1065.86,4605 1136.28,4534.58 1136.28,4513.59 1174.7,4475.17 v1(1208.13,4475.17) ; v1(1280.96,3969) 1250.87,3999.1 1247.28,3999.1 1247.28,4126.32 v1(1250,4129.04) 1292.4,4171.44 1292.4,4241.08 1237.89,4295.59 1237.89,4355.41 1421.08,4538.6 v1(1423.83,4538.6) 1423.83,4538.5 1438.54,4523.79 1824.33,4523.79 1984.39,4363.73 v1(2023.27,4363.73)
EZFET_VCC: C31.1 C32.1 C33.1 C34.1 J10.9 R55.2 R57.2 R62.1 R63.1 R68.2 R74.2 U2.11 U2.15 U2.40 | length 3241.8
  Top Layer w10: R57.2@572,4495.38 616.28,4495.38 644.79,4466.87 650.67,4466.87 655.67,4461.87 679.65,4461.87 v1(680.52,4461) R55.2@710.44,4461 ; C31.1@579.07,4123.37 662.04,4123.37 ; C31.1@608.09,4122.86 608.09,4080.57 v1(608.6,4080.06) 659.12,4080.06 U2.15@706.96,4032.23 ; C33.1@679.13,4202.53 736.16,4202.53 C32.1@741.58,4207.95 ; C33.1@687.01,4198.59 687.01,4183.68 675,4171.68 675,4127.31 671.07,4123.37 662.04,4123.37 ; U2.11@762.63,4087.9 742.49,4108.05 690.33,4108.05 675,4123.37 662.04,4123.37 ; v1(953,4558) 1077.69,4558 R62.1@1081.15,4554.53 R63.1@1122.53,4554.53 ; U2.40@1035.46,3870.96 1052.74,3853.67 1076.98,3853.67 1105.65,3825 1107.6,3825 v1(1125.86,3806.74) 1125.86,3756.99 C34.1@1114.32,3745.46 ; v1(1446.28,3948.24) R74.2@1446.28,3994.83 ; R74.2@1450,3998.55 R74.2@1446.28,3994.83 ; R68.2@1482.5,4041.36 1446.28,4005.14 R74.2@1446.28,3994.83
  Bottom Layer w10: v1(608.6,4080.06) 676.72,4080.06 1066.69,3690.09 ; v1(675,4169.05) 675,4195.35 718.5,4238.85 718.5,4460.76 724.61,4466.87 ; v1(680.52,4461) 682.37,4462.85 700.6,4462.85 704.61,4466.87 724.61,4466.87 ; J10.9@871.53,3435.02 881.85,3445.34 881.85,3482.5 1066.69,3667.34 1066.69,3690.09 ; v1(953,4558) 853.14,4558 762.02,4466.87 724.61,4466.87 ; v1(1446.28,3948.24) 1304.78,3806.74 v1(1125.86,3806.74) 1125.86,3749.26 1066.69,3690.09
EZFET_Vcore: C29.1 U2.17 | length 270.1
  Top Layer w10: C29.1@486.58,4130.27 486.58,4126.34 493.39,4119.53 497.33,4119.53 634.74,3982.12 U2.17@693.04,3982.12
EZFET_VREF: C25.1 U2.9 | length 108
  Top Layer w10: U2.9@790.47,4115.94 773.64,4132.77 773.64,4160.47 790.37,4177.2 790.37,4203 C25.1@795.32,4207.95
EZFET_VUSB: C30.1 U2.54 | length 124
  Top Layer w10: U2.54@1077.21,4088.1 1125.07,4135.87 C30.1@1165.67,4174.93
EZFET_XT2IN: U2.57 Y1.1 | length 201.2
  Top Layer w10: U2.57@1035.46,4129.86 1061.02,4155.43 1061.02,4231.4 Y1.1@1124.02,4294.39
EZFET_XT2OUT: U2.58 Y1.3 | length 234
  Top Layer w10: U2.58@1021.54,4143.78 1040.69,4162.93 1040.69,4318.67 1029.53,4329.83 Y1.3@1029.53,4365.26
FAULT: D12.2 U1.40 | length 403.4
  Top Layer w10: D12.2@854.91,1282.01 854.91,1457.01 966.5,1568.61 966.5,1637.86 U1.40@967.41,1638.76